# Altium PCB TZ-SB-0001-PCB-[A] (HydroScope Mainboard).PcbDoc (part 1 of 4)
Units mil, origin at the board's own origin, x right, y up, seen from the top; angles counter-clockwise.
Board outline 4500 x 970 mil, 4 copper layers (Top Layer, GND-PWR, GND, Bottom Layer), stack 64.112 mil thick; 165 components, 114 nets, 573 pads, 320 vias.
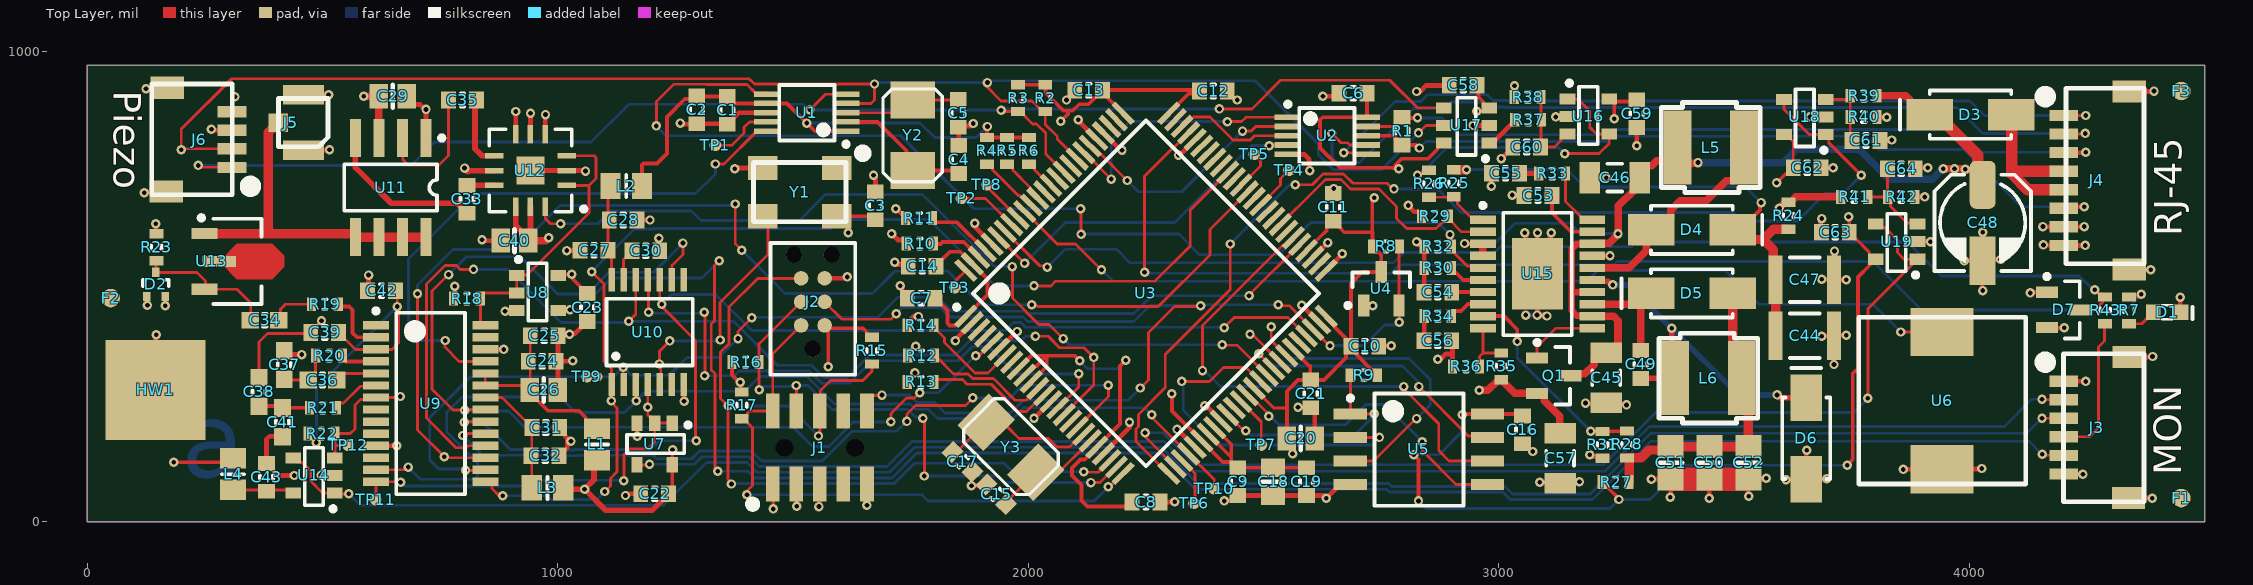
[diagram p0: Top Layer view]
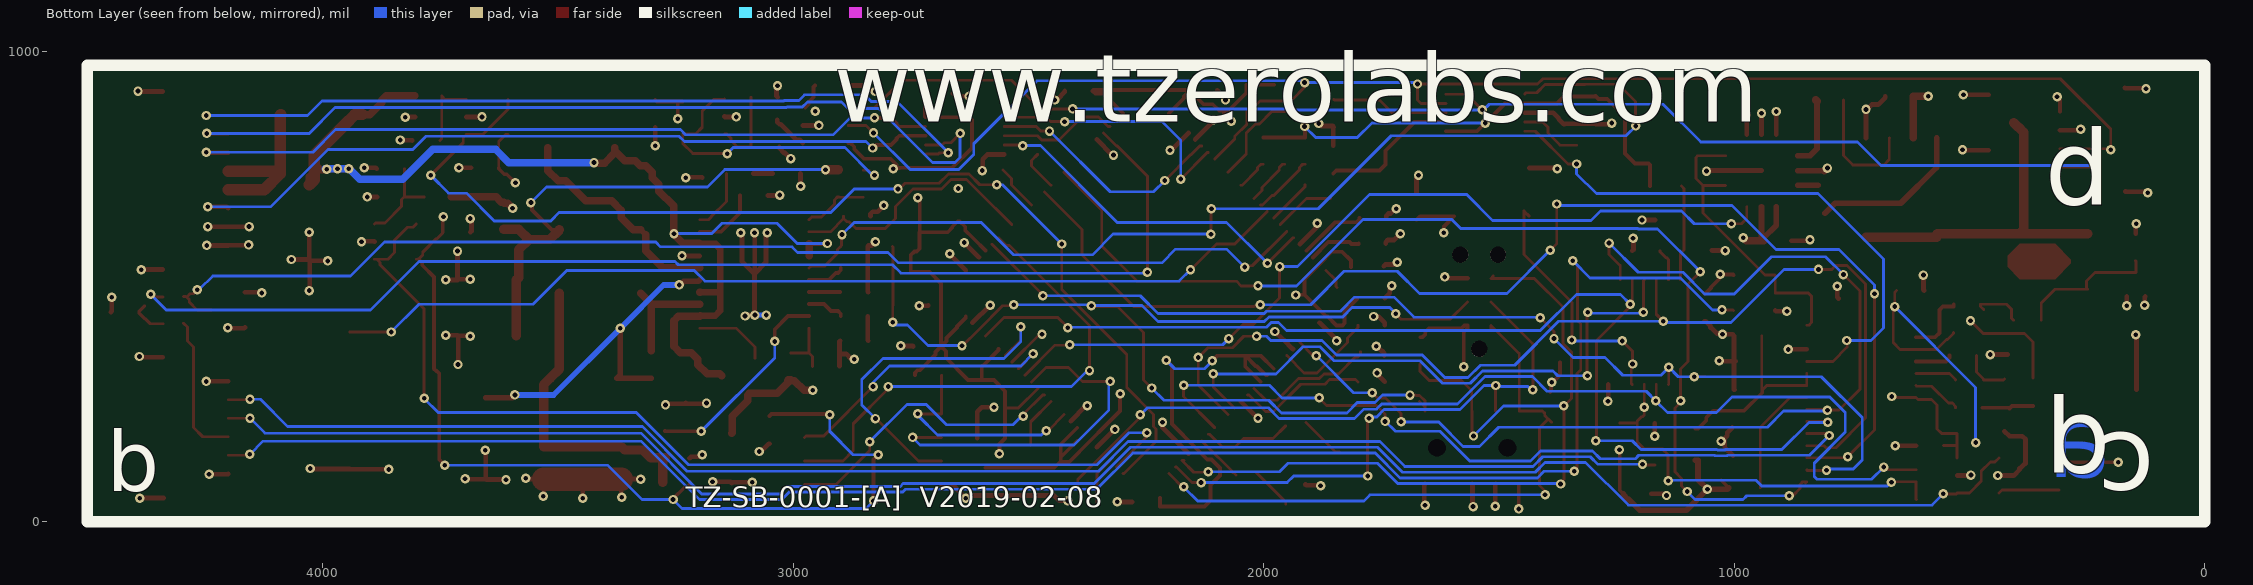
[diagram p1: Bottom Layer view, seen from below]
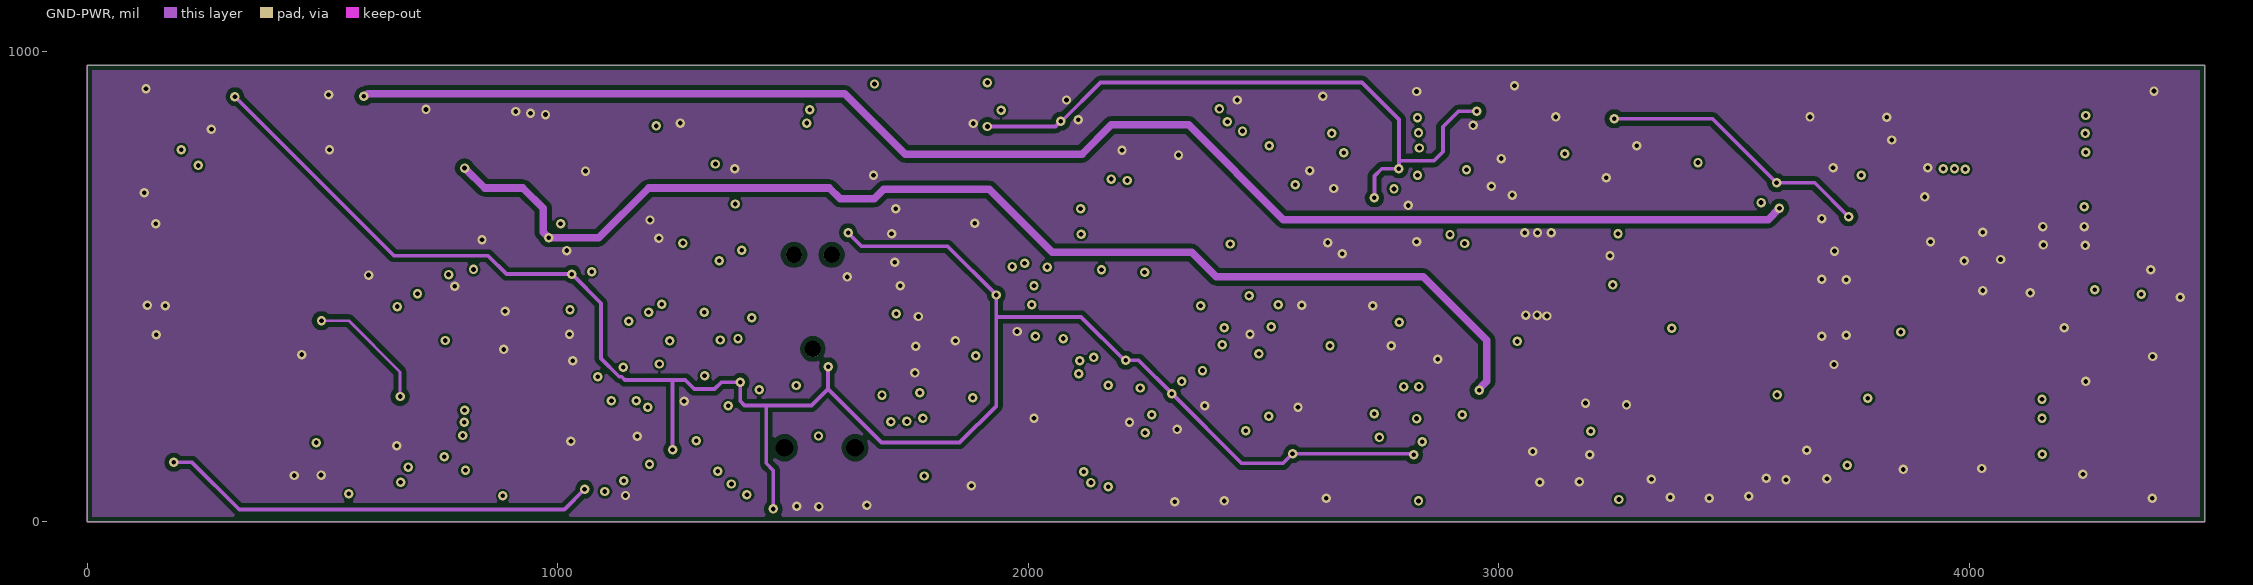
[diagram p2: GND-PWR]
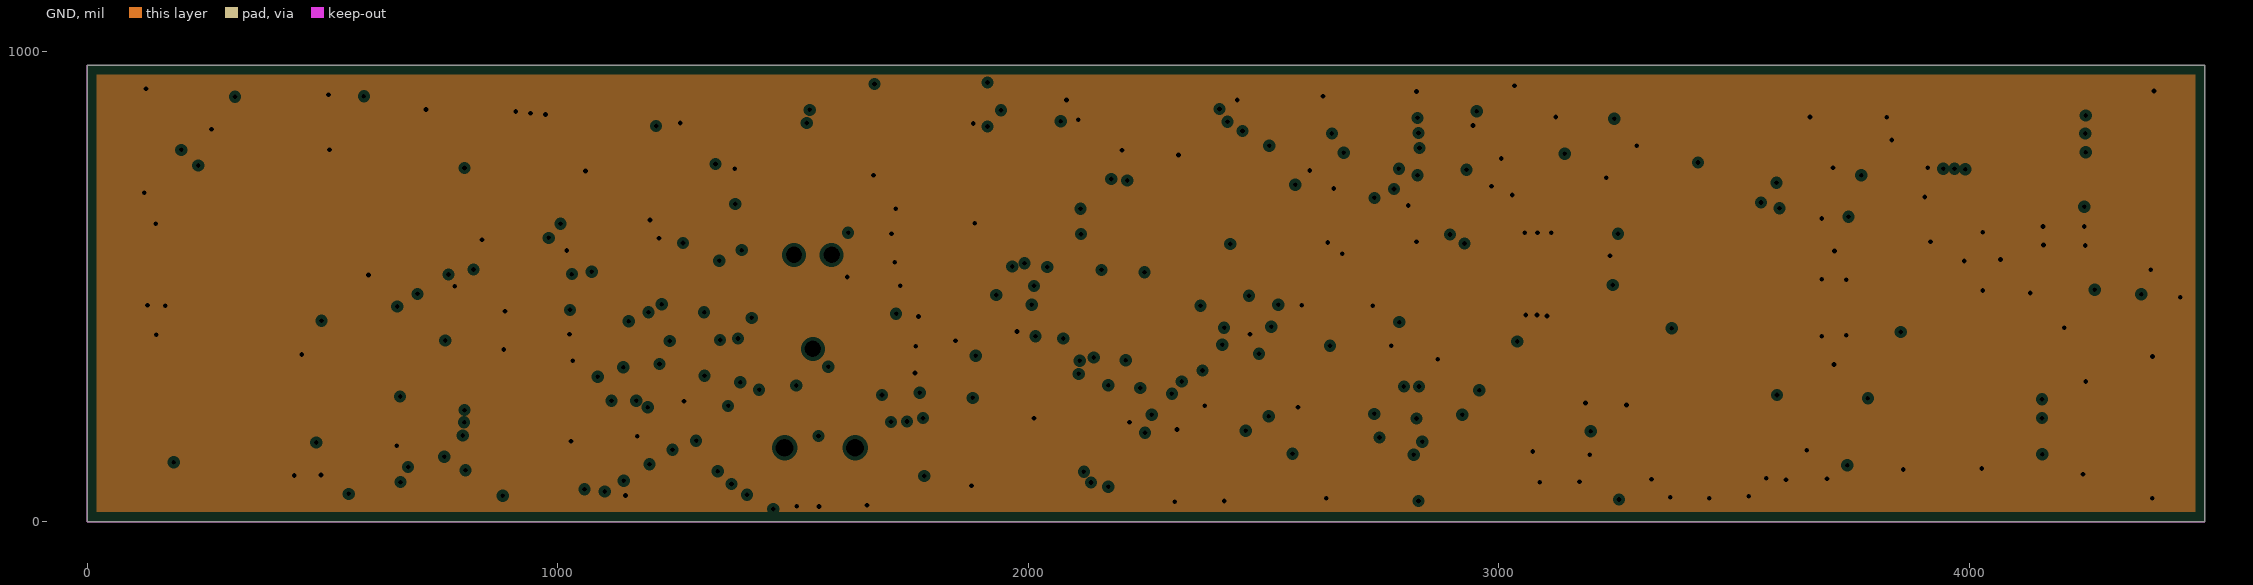
[diagram p3: GND, clearances drawn from the general rule]
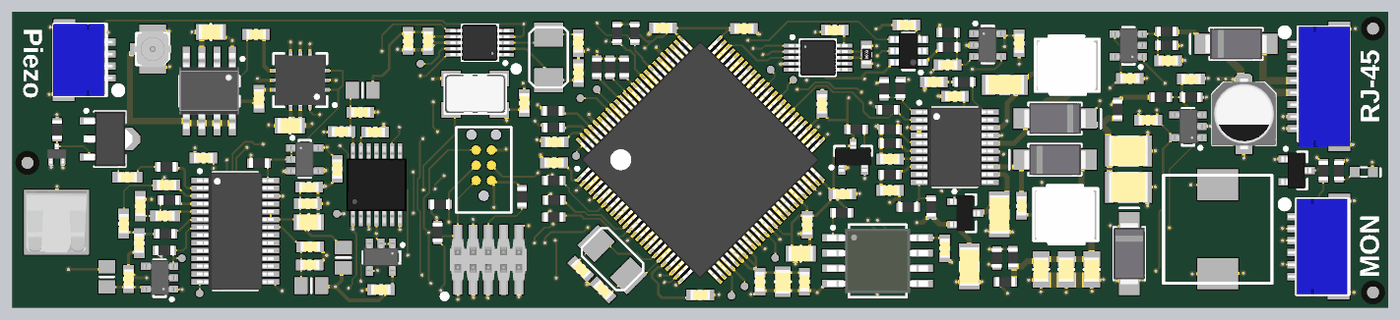
[diagram p6: 3D render of the assembled board from above, using the file's embedded part models]

## Layer stack, top to bottom
Top Solder: solder mask 0.4, Solder Resist, Dk 3.5
Top Layer: signal copper 1.3779
PP1: prepreg 9.8, 2x 2116, Dk 4.2
GND-PWR: signal copper 1.3779
CORE2: core 39, Dk 4.2
GND: plane copper 1.3779, net GND
Dielectric 2: prepreg 9.8, 2x 2116, Dk 4.2
Bottom Layer: signal copper 1.3779
Bottom Solder: solder mask 0.4, Solder Resist, Dk 3.5

## Board outline
0,0 0,970 4500,970 4500,0

## Design rules (kind name [scope] priority, off if disabled: settings)
Clearance Clearance_1 [All] p1: gap=6 ignorepadtopadclearanceinfootprint=FALSE except(10: Arc-Poly Track-Poly SMDPad-Poly THPad-Poly Via-Poly Fill-Poly Poly-Poly)
Clearance [InNet('+HV')] p2: gap=16 ignorepadtopadclearanceinfootprint=FALSE
ComponentClearance ComponentClearance_1 [IsVia vs IsText and OnBottomLayer] p1: gap=0 collisioncheckmode=3 verticalgap=0 showdistances=FALSE
ComponentClearance [All] p2: gap=0 collisioncheckmode=3 verticalgap=0 showdistances=FALSE
PlaneClearance [All] p1: clearance=8
PlaneConnect [All] p1: planeconnectstyle=Direct reliefexpansion=20 reliefentries=4 reliefconductorwidth=10 reliefairgap=10
PolygonConnect [All] p1: connectstyle=Direct reliefconductorwidth=10 reliefentries=4 polygonreliefangle="90 Angle" airgapwidth=10
RoutingVias [All] p1: holewidth=10 width=20 viastyle="Through Hole" minholewidth=10 minwidth=20 maxholewidth=50 maxwidth=75
ShortCircuit ShortCircuit_2 [InNet('+3.3v') vs IsText and OnBottomLayer] p1: allowed=FALSE
ShortCircuit ShortCircuit_1 [InNet('GND') vs IsText and OnBottomLayer] p2: allowed=TRUE
ShortCircuit [All] p3: allowed=FALSE
SilkToSolderMaskClearance SilkscreenOverComponentPads [IsPad] p1: minsilkscreentomaskgap=10 clearancetoexposedcopper=TRUE
SolderMaskExpansion [All] p1: expansion=4 istentingtop=FALSE
SupplyNets "Schematic Supply Nets_10" [InNet('+3.3v+_TDC1000')] p1: voltage=0.000
SupplyNets "Schematic Supply Nets_9" [InNet('+HV')] p2: voltage=0.000
SupplyNets "Schematic Supply Nets_8" [InNet('+MOS_DRV')] p3: voltage=0.000
SupplyNets "Schematic Supply Nets_7" [InNet('+3.3v+_TDC7200')] p4: voltage=0.000
SupplyNets "Schematic Supply Nets_6" [InNet('GND')] p5: voltage=0.000
SupplyNets "Schematic Supply Nets_5" [InNet('+V_ADJ')] p6: voltage=0.000
SupplyNets "Schematic Supply Nets_4" [InNet('DC_DC_VIN')] p7: voltage=0.000
SupplyNets "Schematic Supply Nets_3" [InNet('+VIN')] p8: voltage=0.000
SupplyNets "Schematic Supply Nets_2" [InNet('VCOM')] p9: voltage=0.000
SupplyNets "Schematic Supply Nets_1" [InNet('+HV_PRE')] p10: voltage=0.000
SupplyNets "Schematic Supply Nets" [InNet('+3.3v')] p11: voltage=0.000
Width [All] p1: maxlimit=200 minlimit=6 preferedwidth=6
25 further rules are at their usual default settings.

## Classes and differential pairs
component class "TOP_LEVEL (TZ-SB-0001-[A])": D7 F1 F2 F3 HW1 J3 J4 J5 J6 PCB1 R43

## Components (designator, comment, footprint, x,y, rotation, side; value= is the part's Value field where it differs from the comment)
C1 "0.1µF" C0603_0.90MM_HD 1360,874 r90 top
C2 "0.1µF" C0603_0.90MM_HD 1295,875 r90 top
C3 "0.1µF" C0603_0.90MM_HD 1675,671 r270 top
C4 "18pF" C0603_0.90MM_HD 1852,769.54 r270 top
C5 "18pF" C0603_0.90MM_HD 1851,867.78 r90 top
C6 "0.1µF" C0603_0.90MM_HD 2690,910 r180 top
C7 "0.1µF" C0603_0.90MM_HD 1772,475 r0 top
C8 "0.1µF" C0603_0.90MM_HD 2249.91,41.61 r180 top
C9 "0.1µF" C0603_0.90MM_HD 2445,85 r90 top
C10 "0.1µF" C0603_0.90MM_HD 2715,372.39 r180 top
C11 "0.1µF" C0603_0.90MM_HD 2648,668 r270 top
C12 "0.1µF" C0603_0.90MM_HD 2393,915 r180 top
C13 "0.1µF" C0603_0.90MM_HD 2128,917 r0 top
C14 "0.1µF" C0603_0.90MM_HD 1774.13,542.97 r0 top
C15 "18pF" C0603_0.90MM_HD 1932,58 r315 top
C16 "0.1µF" C0603_0.90MM_HD 3050,195 r90 top
C17 "18pF" C0603_0.90MM_HD 1860,127 r135 top
C18 "10µF" C0805_1.45MM_HD 2520,85 r90 top
C19 "0.1µF" C0603_0.90MM_HD 2591.03,85 r90 top
C20 "10µF" C0805_1.45MM_HD 2579,177 r180 top
C21 "0.1µF" C0603_0.90MM_HD 2600,271.46 r90 top
C22 "0.1µF" C0603_0.90MM_HD 1206,59 r0 top
C23 "0.1µF" C0603_0.90MM_HD 1063,455 r90 top
C24 "10000pF" C0603_0.95MM_HD 967,341 r180 top
C25 "0.1µF" C0603_0.90MM_HD 971,395 r180 top
C26 "10µF" C0805_1.45MM_HD 970,280 r180 top
C27 "0.1µF" C0603_0.90MM_HD 1077,577 r0 top
C28 "1µF" C0603_0.95MM_HD 1139,641 r180 top
C29 "0.47µF" C0805_1.45MM_HD 649.47,904 r180 top
C30 "1µF" C0603_0.95MM_HD 1187,575.48 r0 top
C31 "10000pF" C0603_0.90MM_HD 974.51,200 r180 top
C32 "0.1µF" C0603_0.90MM_HD 973,140 r180 top
C33 "10000pF" C0603_0.95MM_HD 807,685 r270 top
C34 "300pF" C0603_0.90mm_MD 377,428 r0 top
C35 "10000pF" C0603_0.95MM_HD 797.48,896 r180 top
C36 "300pF" C0603_0.90mm_MD 500,301 r180 top
C37 "300pF" C0603_0.90mm_MD 419,333 r270 top
C38 "300pF" C0603_0.90mm_MD 365,275.52 r90 top
C39 "50pF" C0603_0.90MM_HD 504.54,402 r180 top
C40 "0.47µF" C0805_1.45MM_HD 908,597 r0 top
C41 "300pF" C0603_0.90mm_MD 415,211 r270 top
C42 "10000pF" C0603_0.95MM_HD 625.52,491 r0 top
C43 "0.1µF" C0603_0.90MM_HD 381,94 r270 top
C44 "4.7µF" C1210_2.80MM_HD 3650,395 r0 top
C45 "10µF" C1206_1.90MM_HD 3228,306 r90 top
C46 "10µF" C1206_1.90MM_HD 3246,731 r0 top
C47 "4.7µF" C1210_2.80MM_HD 3650,514 r180 top
C48 "33µF" C_ALU_C 4028,635 r270 top
C49 "0.1µF" C0603_0.90MM_HD 3301,334 r90 top
C50 "10µF" C0805_1.45MM_MD 3447,125 r90 top
C51 "10µF" C0805_1.45MM_MD 3365,125 r90 top
C52 "10µF" C0805_1.45MM_MD 3530,125 r90 top
C53 "0.1µF" C0603_0.90MM_HD 3083,693 r0 top
C54 "0.1µF" C0603_0.90MM_HD 2870,487.4 r0 top
C55 "4700pF" C0603_0.95MM_HD 3014,740 r0 top
C56 "4700pF" C0603_0.95MM_HD 2870,384.54 r180 top
C57 "10µF" C1206_1.90MM_HD 3130,135 r90 top
C58 "0.1µF" C0603_0.90MM_HD 2924,927 r0 top
C59 "0.1µF" C0603_0.90MM_HD 3293,867 r90 top
C60 "0.1µF" C0603_0.90MM_HD 3059,796 r0 top
C61 "0.1µF" C0603_0.90MM_HD 3780,810 r180 top
C62 "0.1µF" C0603_0.90MM_HD 3655,752 r180 top
C63 "0.1µF" C0603_0.90MM_HD 3715,615 r0 top
C64 "0.1µF" C0603_0.90MM_HD 3855,750 r180 top
D1 "LED 1.6X0.8MM 570NM GRN CLR SMD" "LED_0603 - GREEN" 4420,445 r0 top
D2 "BAV99T-7-F" D_SOT-523_P 146,504 r90 top
D3 "B160-13-F" D_SMA_P 4002,865 r180 top
D4 "B160-13-F" D_SMA_P 3410,620 r0 top
D5 "B160-13-F" D_SMA_P 3410,485 r180 top
D6 "B160-13-F" D_SMA_P 3653,177 r90 top
D7 "BAV99,215" SOT-23 4200,450 r0 top
F1 "PCB Fiducial" "Fiducial 1mm - 2mm"#1 4441,49.86 r0 top
F2 "PCB Fiducial" "Fiducial 1mm - 2mm"#2 65,578 r0 top
F3 "PCB Fiducial" "Fiducial 1mm - 2mm"#3 4450,913.98 r0 top
HW1 "S8111-46R" S8111-46R 145,280 r0 top
J1 "FTSH-105-01-F-DV" "FTSH-105-04-F-DV - HD" 1557,157 r0 top
J2 "TC2030‐CTL‐NL" "TC2030 NO LATCH" 1542,467 r90 top
J3 "SM6B-SRSS-TB(LF)(SN)" SM06B-SRSS-TB(LF)(SN) 4270,200 r270 top
J4 "SM08B-SRSS-TB(LF)(SN)" SM08B-SRSS-TB(LF)(SN) 4270,725 r270 top
J5 "1909763-1" 1909763-1 433,848 r270 top
J6 "SM04B-SRSS-TB(LF)(SN)" SM04B-SRSS-TB(LF)(SN) 238,812 r90 top
L1 "BKP2125HS600-T" C0805_0.8mm 1083,164 r90 top
L2 "BKP2125HS600-T" C0805_0.8mm 1145.54,713 r0 top
L3 "BKP2125HS600-T" C0805_0.8mm 978,72 r180 top
L4 "BKP2125HS600-T" C0805_0.8mm 310,100.87 r90 top
L5 "22µH 0.9A" L_NRS5020 3450,795 r0 top
L6 "22µH 0.9A" L_NRS5020 3445,305 r0 top
Q1 "FMMT491TA" SOT-23 3116.54,310 r0 top
R1 "100" R0603_HD 2794,830 r90 top
R2 "1k" R0603_0.55MM_HD 2036,900 r90 top
R3 "1k" R0603_0.55MM_HD 1978,900 r90 top
R4 "10k" R0603_0.55MM_HD 1912,788 r270 top
R5 "10k" R0603_0.55MM_HD 1955,788 r270 top
R6 "10k" R0603_0.55MM_HD 2001,788 r270 top
R7 "1k" R0603_0.55MM_HD 4339,449 r90 top
R8 "10k" R0603_0.55MM_HD 2760,585 r180 top
R9 "10k" R0603_0.55MM_HD 2712.6,311.01 r0 top
R10 "10k" R0603_0.55MM_HD 1769.28,591 r0 top
R11 "10k" R0603_0.55MM_HD 1768,645.07 r0 top
R12 "10k" R0603_0.55MM_HD 1772,353 r0 top
R13 "10k" R0603_0.55MM_HD 1771,297 r0 top
R14 "12.4k" R0603_0.55MM_HD 1771,417.31 r0 top
R15 "10k" R0603_0.55MM_HD 1667.46,363.54 r90 top
R16 "10k" R0603_0.55MM_HD 1399,338.85 r180 top
R17 "10k" R0603_0.55MM_HD 1391,247 r90 top
R18 "10k" R0603_0.55MM_HD 807,474 r180 top
R19 "0" R0603_0.55MM_HD 505,462 r0 top
R20 "100" R0603_0.55MM_HD 514,353 r0 top
R21 "100" R0603_0.55MM_HD 501,242 r0 top
R22 "5.1k" R0603_0.55MM_HD 498,187 r0 top
R23 "1k" R0603_0.55MM_HD 147,583 r270 top
R24 "0" R0603_0.55MM_HD 3615,650 r270 top
R25 "560k" R0603_0.55MM_HD 2904,719 r90 top
R26 "10k" R0603_0.55MM_HD 2851,718 r270 top
R27 "0" R0603_0.55MM_HD 3248,84 r0 top
R28 "31.6k" R0603_0.55MM_HD 3272,164 r270 top
R29 "10k" R0603_0.55MM_HD 2864,649 r0 top
R30 "43k" R0603_0.55MM_HD 2870,539.09 r0 top
R31 "10k" R0603_0.55MM_HD 3220,163 r90 top
R32 "10k" R0603_0.55MM_HD 2870,585 r0 top
R33 "43k" R0603_0.55MM_HD 3113,740 r0 top
R34 "43k" R0603_0.55MM_HD 2870,436.73 r0 top
R35 "100k" R0603_0.55MM_HD 3005,330 r270 top
R36 "10k" R0603_0.55MM_HD 2930,330 r0 top
R37 "31.6k" R0603_0.55MM_HD 3062,854 r180 top
R38 "10k" R0603_0.55MM_HD 3061,902 r0 top
R39 "374k" R0603_0.55MM_HD 3775,905 r0 top
R40 "10k" R0603_0.55MM_HD 3775,860 r180 top
R41 "374k" R0603_0.55MM_HD 3755,690 r180 top
R42 "10k" R0603_0.55MM_HD 3855,690 r180 top
R43 "1k" R0603_0.55MM_HD 4288,449 r90 top
TP1 "SMT_TEST" "SMT_TP - 25" 1335,800 r0 top
TP2 "SMT_TEST" "SMT_TP - 25" 1858,687 r0 top
TP3 "SMT_TEST" "SMT_TP - 25" 1844,497.27 r0 top
TP4 "SMT_TEST" "SMT_TP - 25" 2554,747 r90 top
TP5 "SMT_TEST" "SMT_TP - 25" 2480,780.63 r90 top
TP6 "SMT_TEST" "SMT_TP - 25" 2352,39 r0 top
TP7 "SMT_TEST" "SMT_TP - 25" 2495,163 r0 top
TP8 "SMT_TEST" "SMT_TP - 25" 1912,716 r0 top
TP9 "SMT_TEST" "SMT_TP - 25" 1062,308 r0 top
TP10 "SMT_TEST" "SMT_TP - 25" 2395,70 r0 top
TP11 "SMT_TEST" "SMT_TP - 25" 613,47 r0 top
TP12 "SMT_TEST" "SMT_TP - 25" 555,162 r90 top
U1 "SI5351A-B-GTR" "10 MSOP" 1529,869 r180 top
U2 "ISL3176EIUZ-T" "10 MSOP" 2635,820 r0 top
U3 "LPC54606J512BD100E" TSQFP50P1600X1600X160-100N 2250,485 r45 top locked
U4 "MIC803-30D2VM3-TR" SOT-23 2750,495 r90 top
U5 "W25Q64JVSSIQ" SOIC127P830X200-8L 2830,154 r0 top
U6 "PKMCS0909E4000-R1" PKMCS0909E4000-R1 3942,257 r270 top
U7 "SN74AHC1G08DBVR" SOT95P245X145-5L 1206,165 r270 top
U8 "SN74AHC1G08DBVR" SOT95P245X145-5L 957,486 r0 top
U9 "TDC1000PW" TSOP65P640X120-28N 729.86,250.98 r0 top
U10 "TDC7200PWR" TSSOP14 1204,402.78 r90 top
U11 "TC6320TG-G" "SOIC 8" 645,710 r180 top
U12 "MD1213K6-G" QFN80P400X400X100_HS-13N 942,746 r180 top
U13 "MD0100N8-G" SOT89-150P410X160-3N 320,553 r0 top
U14 "OPA353NA/250" SOT23-5 482,98.11 r180 top
U15 "LT3570EFE#PBF" TSOP65P640X120_HS-21N 3082.11,526.3 r0 top
U16 "OPA348AIDBVR" SOT23-5 3190,861 r0 top
U17 "MCP4725A0T-E/CH" SOT95P245X145-6L 2931,842 r180 top
U18 "OPA348AIDBVR" SOT23-5 3650,860 r180 top
U19 "OPA348AIDBVR" SOT23-5 3845,595 r180 top
Y1 "FOX924B-16.000" FOX924 1514.26,700.18 r180 top
Y2 "ABM3-25.000MHZ-B4Y-T" ABM3 1754,821 r270 top
Y3 "12MHz" ABM3 1963,157.89 r315 top

## Footprints (in the part's own frame and the unit in brackets; to place one, negate y for a bottom-side part, rotate by r counter-clockwise, add the part's x,y. Pads: shape width x height; smd on the part's side, far side on the other; paste and mask are expansions set on the pad)
"10 MSOP" [mm] "(Reference LTC DWG # 05-08-1661 Rev E)"
  rect 1.45x0.3 smd: 1(-2.125,1) 2(-2.125,0.5) 3(-2.125,0) 4(-2.125,-0.5) 5(-2.125,-1) 6(2.125,-1) 7(2.125,-0.5) 8(2.125,0) 9(2.125,0.5) 10(2.125,1)
  silkscreen extent -2.25,-1.5 1.48,1.82, body extent -2.45,-1.5 2.45,1.5, height 1.15
1909763-1 [mm] "CONN UMCC JACK STR 50OHM SMD"
  rect 1.05x2.2 smd: 1(-1.5,0.675) 2(1.5,0.675)
  rect 1x1.05 smd: 3(0,-0.675)
  silkscreen extent -1.3,-0.67 1.3,2, body extent -1.5,-0.87 1.5,2.23, height 1.24
ABM3 [mm] "Abracon Crystal 5x3.2mm"
  rect 2x2.4 smd: 1(-1.9,0) 2(1.9,0)
  silkscreen extent -2.5,-1.6 2.5,1.6, body extent -2.5,-1.6 2.5,1.6, height 1.3
C0603_0.90MM_HD [mm] "Capacitor 0603 - High Density"
  rect 0.8x0.9 smd: 1(-0.75,0) 2(0.75,0)
  silkscreen extent -0.1,-0.35 0.1,0.35, body extent -0.8,-0.4 0.8,0.4, height 0.9
C0603_0.90mm_MD [mm] "Capacitor 0603 - Medium Density"
  rect 0.95x0.9 smd: 1(-0.775,0) 2(0.775,0)
  silkscreen extent -0.1,-0.35 0.1,0.35, body extent -0.8,-0.4 0.8,0.4, height 0.9
C0603_0.95MM_HD [mm] "Capacitor 0603 - High Density"
  rect 0.8x0.9 smd: 1(-0.75,0) 2(0.75,0)
  silkscreen extent -0.1,-0.35 0.1,0.35, body extent -0.8,-0.4 0.8,0.4, height 0.9
C0805_0.8mm [mm] "Chip Capacitor, Body 2.0x0.8mm, IPC High Density"
  rect 1.1x1.4 smd: 1(-0.85,0) 2(0.85,0)
  silkscreen extent 0,-0.6 0,0.6, body extent -1,-0.6 1,0.6, height 0.8
C0805_1.45MM_HD [mm] "Capacitor - 0805 - High Density"
  rect 1x1.3 smd: 1(-0.75,0) 2(0.75,0)
  silkscreen extent 0,-0.62 0,0.63, body extent -1,-0.64 1,0.61, height 1.45
C0805_1.45MM_MD [mm] "Capacitor - 0805 - Medium Density"
  rect 1.25x1.4 smd: 1(-0.875,0) 2(0.875,0)
  silkscreen extent 0,-0.62 0,0.63, body extent -1,-0.62 1,0.63, height 1.45
C1206_1.90MM_HD [mm] "Capacitor - 1206 - High Density"
  rect 1.1x1.7 smd: 1(-1.35,0) 2(1.35,0)
  silkscreen extent -0.4,-0.75 0.4,0.75, body extent -1.6,-0.8 1.6,0.8, height 1.9
C1210_2.80MM_HD [mm] "Capacitor - 1210 - High Density"
  rect 0.75x2.6 smd: 1(-1.575,0) 2(1.575,0)
  silkscreen extent -0.8,-1.2 0.8,1.2, body extent -1.6,-1.25 1.6,1.25, height 2.8
C_ALU_C [mm] "5.0mm x 5.8mm"
  rrect50% 2.6x1.4 smd: 1(-2.05,0)
  rect 2.6x1.4 smd: 2(2.05,0)
  silkscreen extent -2.6,-2.6 2.6,2.6, body extent -2.98,-2.65 2.92,2.65, height 5.42
D_SMA_P [mm] "SMA Diode - Polarized"
  rect 2.5x1.7 smd: 1(-2.2,0) 2(2.2,0)
  silkscreen extent -2.2,-1.3 3.8,1.3, body extent -2.6,-1.3 2.6,1.3, height 2.35
D_SOT-523_P [mm] "SOT-523 Diode - Polarized"
  rect 0.51x0.4 smd: 1(-0.65,0.5) 2(-0.65,-0.5) 3(0.65,0)
  silkscreen extent -0.1,-0.7 0.25,0.7, body extent -0.8,-0.8 0.8,0.8, height 0.8
"Fiducial 1mm - 2mm"#1 [mm] "1mm Pad 2mm Opening"
  round 1 smd mask+0.5: 1(0.229,0.004)
"Fiducial 1mm - 2mm"#2 [mm] "1mm Pad 2mm Opening"
  round 1 smd mask+0.5: 1(-0.381,-2.616)
"Fiducial 1mm - 2mm"#3 [mm] "1mm Pad 2mm Opening"
  round 1 smd mask+0.5: 1(0,0.026)
FOX924 [mm] "3.3V Ultra Miniature SMD HCMOS TCXO/VCTCXO"
  rect 1.6x1.3 smd: 1(-2,-1.3) 2(2,-1.3) 3(2,1.3) 4(-2,1.3)
  silkscreen extent -3.62,-2.32 2.5,1.6, body extent -2.5,-1.62 2.5,1.58, height 1.6
"FTSH-105-04-F-DV - HD" [mil] "Connector for Cortex Serial Wire Debug"
  rect 29x75 smd: 1(-100,-77) 2(-100,78) 3(-50,-77) 4(-50,78) 5(0,-77) 6(0,78) 7(50,-77) 8(50,78) 9(100,-77) 10(100,78)
  rect 0x0 hole 38 unplated: M(-75,0) M(75,0)
  body extent -125,-115 125,115, height 264
L_NRS5020 [mm] "Inductor"
  rect 1.5x4 smd: 1(-1.8,0) 2(1.8,0)
  silkscreen extent -2.67,-2.43 2.67,2.43, body extent -2.5,-2.47 2.4,2.43, height 2
"LED_0603 - GREEN" [mm] "LED_0603 - GREEN"
  rect 0.8x0.85 smd: A(-0.75,0) C(0.75,0)
  silkscreen extent -0.25,-0.38 1.37,0.38, body extent -0.8,-0.4 0.8,0.4, height 0.75
PKMCS0909E4000-R1 [mm]
  rect 2.6x3.4 smd: 1(-3.7,0) 2(3.7,0)
  silkscreen extent -4.5,-4.5 4.5,4.5, body extent -4.5,-4.5 4.5,4.5, height 1.9
QFN80P400X400X100_HS-13N [mm] "QFN, 12-Leads, Body 4.00x4.00mm, Pitch 0.80mm, Thermal Pad 1.50x1.50mm, IPC Medium Density"
  rect 1x0.3 smd: 1(-1.95,0.8) 2(-1.95,0) 3(-1.95,-0.8) 7(1.95,-0.8) 8(1.95,0) 9(1.95,0.8)
  rect 0.3x1 smd: 4(-0.8,-1.95) 5(0,-1.95) 6(0.8,-1.95) 10(0.8,1.95) 11(0,1.95) 12(-0.8,1.95)
  rect 1.5x1.5 smd: 13(0,0)
  silkscreen extent -3,-2.23 2.23,2.22, body extent -2.12,-2.12 2.12,2.12, height 1
R0603_0.55MM_HD [mm] "Resistor 0603 High Density"
  rect 0.5x0.75 smd: 1(-0.725,0) 2(0.725,0)
  silkscreen extent -0.1,-0.28 0.1,0.28, body extent -0.8,-0.4 0.8,0.4, height 0.55
R0603_HD [mm] "0603 Resistor - High Density"
  rect 0.8x0.9 smd: 1(-0.75,0) 2(0.75,0)
  silkscreen extent -0.15,-0.35 0.15,0.35, body extent -0.8,-0.4 0.8,0.4, height 0.46
S8111-46R [mm]
  rect 5.4x5.4 smd: 1(0,0)
  body extent -2.51,-2.55 2.49,2.55, height 1.85
SM04B-SRSS-TB(LF)(SN) [mm] "CONN HEADR SH 4POS SIDE 1MM TIN"
  rect 0.6x1.55 smd: 1(-1.5,-1.769) 2(-0.5,-1.769) 3(0.5,-1.769) 4(1.5,-1.769)
  rect 1.2x1.8 smd: M1(-2.8,1.769) M2(2.8,1.719)
  silkscreen extent -2.97,-3.05 3,2.56, body extent -3,-2.31 3,2.64, height 2.91
SM06B-SRSS-TB(LF)(SN) [mm] "CONN HEADR SH 6POS SIDE 1MM TIN"
  rect 0.6x1.55 smd: 1(-2.5,-1.769) 2(-1.5,-1.769) 3(-0.5,-1.769) 4(0.5,-1.769) 5(1.5,-1.769) 6(2.5,-1.769)
  rect 1.2x1.8 smd: M1(-3.8,1.769) M2(3.8,1.719)
  silkscreen extent -3.97,-3.05 4,2.56, body extent -4,-2.51 4,2.44, height 2.97
SM08B-SRSS-TB(LF)(SN) [mm] "CONN HEADR SH 8POS SIDE 1MM TIN"
  rect 0.6x1.55 smd: 1(-3.5,-1.769) 2(-2.5,-1.769) 3(-1.5,-1.769) 4(-0.5,-1.769) 5(0.5,-1.769) 6(1.5,-1.769) 7(2.5,-1.769) 8(3.5,-1.769)
  rect 1.2x1.8 smd: M1(-4.8,1.769) M2(4.8,1.769)
  silkscreen extent -4.97,-3.05 4.5,2.56, body extent -5,-2.3 5,2.65, height 2.91
"SMT_TP - 25" [mil] ".025\" SMT Test pad"
  round 25 smd: 1(0,0)
SOIC127P830X200-8L [mm] "SOIC, 8-Leads, Body 6.1x6.2mm (max), Pitch 1.27mm, IPC High Density"
  rect 1.8x0.6 smd: 1(-3.7,1.905) 2(-3.7,0.635) 3(-3.7,-0.635) 4(-3.7,-1.905) 5(3.7,-1.905) 6(3.7,-0.635) 7(3.7,0.635) 8(3.7,1.905)
  silkscreen extent -3.82,-3.05 2.4,3, body extent -4.2,-2.7 4.2,2.68, height 2.3
"SOIC 8" [mm]
  rect 0.6x2.05 smd: 1(-1.905,-2.675) 2(-0.635,-2.675) 3(0.635,-2.675) 4(1.905,-2.675) 5(1.905,2.675) 6(0.635,2.675) 7(-0.635,2.675) 8(-1.905,2.675)
  silkscreen extent -2.88,-2.8 2.5,1.25, body extent -2.49,-3.19 2.51,3.14, height 1.88
SOT23-5 [mm] "SOT23, 5-Leads, Body 3.1x2.6mm (max), Pitch 0.95mm, IPC High Density"
  rect 0.85x0.6 smd: 1(-1.125,0.95) 2(-1.125,0) 3(-1.125,-0.95) 4(1.125,-0.95) 5(1.125,0.95)
  silkscreen extent -1.15,-1.5 0.5,1.92, body extent -1.38,-1.45 1.32,1.45, height 1.15
SOT89-150P410X160-3N [mm] "SOT89, 3-Leads, Body 4.50x2.45mm, Pitch 1.50mm, Lead Span 4.1mm, IPC Medium Density"
  rect 1.4x0.6 smd: 1(-1.8,1.5) 3(-1.8,-1.5)
  rect 1.8x0.6 smd: 2(-1,0)
  Top Layer region: -0.9,0.1 -0.05,0.95 1.85,0.95 2.5,0.3 2.5,-0.3 1.85,-0.95 -0.05,-0.95 -0.9,-0.1
  silkscreen extent -2.09,-2.3 1.28,2.47, body extent -2.2,-2.3 1.85,2.3, height 1.6
SOT95P245X145-5L [mm] "SOT23, 5-Leads, Body 3.1x2.6mm (max), Pitch 0.95mm, IPC High Density"
  rect 0.85x0.6 smd: 1(-1.125,0.95) 2(-1.125,0) 3(-1.125,-0.95) 4(1.125,-0.95) 5(1.125,0.95)
  silkscreen extent -1.15,-1.5 0.5,1.93, body extent -1.38,-1.45 1.32,1.45, height 1.15
SOT95P245X145-6L [mm] "SOT23, 6-Leads, Body 3.1x2.6mm (max), Pitch 0.95mm, IPC High Density"
  rect 0.85x0.6 smd: 1(-1.225,0.95) 2(-1.225,0) 3(-1.225,-0.95) 4(1.225,-0.95) 5(1.225,0) 6(1.225,0.95)
  silkscreen extent -1.15,-1.5 0.5,1.92, body extent -1.5,-1.5 1.5,1.5, height 1.3
SOT-23 [mm] "SOT-23"
  rect 1.2x0.6 smd: 1(-0.9,0.95) 2(-0.9,-0.95) 3(0.9,0)
  silkscreen extent -1.02,-1.55 0.87,1.92, body extent -1.27,-1.5 1.23,1.5, height 1.07
"TC2030 NO LATCH" [mil] "TC2030  NO LATCH"
  round 31 smd paste-40: 1(-50,-25) 2(-50,25) 3(0,-25) 4(0,25) 5(50,-25) 6(50,25)
  round 34 hole 35 unplated: A(-100,0) B(100,40) C(100,-40)
  silkscreen extent -155,-90 125,90
TSOP65P640X120-28N [mm] "TSOP, 28-Leads, Body 9.70x4.40mm, Pitch 0.65mm, IPC Medium Density"
  rect 1.4x0.45 smd: 1(-2.95,4.225) 2(-2.95,3.575) 3(-2.95,2.925) 4(-2.95,2.275) 5(-2.95,1.625) 6(-2.95,0.975) 7(-2.95,0.325) 8(-2.95,-0.325) 9(-2.95,-0.975) 10(-2.95,-1.625) 11(-2.95,-2.275) 12(-2.95,-2.925) 13(-2.95,-3.575) 14(-2.95,-4.225) 15(2.95,-4.225) 16(2.95,-3.575) 17(2.95,-2.925) 18(2.95,-2.275) 19(2.95,-1.625) 20(2.95,-0.975) 21(2.95,-0.325) 22(2.95,0.325) 23(2.95,0.975) 24(2.95,1.625) 25(2.95,2.275) 26(2.95,2.925) 27(2.95,3.575) 28(2.95,4.225)
  silkscreen extent -3.07,-4.9 1.85,5.12, body extent -3.2,-4.9 3.2,4.9, height 1.2
TSOP65P640X120_HS-21N [mm] "TSOP, 20-Leads, Body 6.50x4.40mm, Pitch 0.65mm, Thermal Pad 3.86x2.74mm, IPC Medium Density"
  rect 1.4x0.45 smd: 1(-2.95,2.925) 2(-2.95,2.275) 3(-2.95,1.625) 4(-2.95,0.975) 5(-2.95,0.325) 6(-2.95,-0.325) 7(-2.95,-0.975) 8(-2.95,-1.625) 9(-2.95,-2.275) 10(-2.95,-2.925) 11(2.95,-2.925) 12(2.95,-2.275) 13(2.95,-1.625) 14(2.95,-0.975) 15(2.95,-0.325) 16(2.95,0.325) 17(2.95,0.975) 18(2.95,1.625) 19(2.95,2.275) 20(2.95,2.925)
  rect 2.74x3.86 smd: 21(0,0)
  silkscreen extent -3.07,-3.3 1.85,3.82, body extent -3.2,-3.3 3.2,3.3, height 1.2
TSQFP50P1600X1600X160-100N [mm] "TSQFP, 100-Leads, Body 14.00x14.00mm, Pitch 0.50mm, IPC Medium Density"
  rect 1.5x0.3 smd paste-0.076: 1(-7.75,6) 2(-7.75,5.5) 3(-7.75,5) 4(-7.75,4.5) 5(-7.75,4) 6(-7.75,3.5) 7(-7.75,3) 8(-7.75,2.5) 9(-7.75,2) 10(-7.75,1.5) 11(-7.75,1) 12(-7.75,0.5) 13(-7.75,0) 14(-7.75,-0.5) 15(-7.75,-1) 16(-7.75,-1.5) 17(-7.75,-2) 18(-7.75,-2.5) 19(-7.75,-3) 20(-7.75,-3.5) 21(-7.75,-4) 22(-7.75,-4.5) 23(-7.75,-5) 24(-7.75,-5.5) 25(-7.75,-6) 51(7.75,-6) 52(7.75,-5.5) 53(7.75,-5) 54(7.75,-4.5) 55(7.75,-4) 56(7.75,-3.5) 57(7.75,-3) 58(7.75,-2.5) 59(7.75,-2) 60(7.75,-1.5) 61(7.75,-1) 62(7.75,-0.5) 63(7.75,0) 64(7.75,0.5) 65(7.75,1) 66(7.75,1.5) 67(7.75,2) 68(7.75,2.5) 69(7.75,3) 70(7.75,3.5) 71(7.75,4) 72(7.75,4.5) 73(7.75,5) 74(7.75,5.5) 75(7.75,6)
  rect 0.3x1.5 smd paste-0.076: 26(-6,-7.75) 27(-5.5,-7.75) 28(-5,-7.75) 29(-4.5,-7.75) 30(-4,-7.75) 31(-3.5,-7.75) 32(-3,-7.75) 33(-2.5,-7.75) 34(-2,-7.75) 35(-1.5,-7.75) 36(-1,-7.75) 37(-0.5,-7.75) 38(0,-7.75) 39(0.5,-7.75) 40(1,-7.75) 41(1.5,-7.75) 42(2,-7.75) 43(2.5,-7.75) 44(3,-7.75) 45(3.5,-7.75) 46(4,-7.75) 47(4.5,-7.75) 48(5,-7.75) 49(5.5,-7.75) 50(6,-7.75) 76(6,7.75) 77(5.5,7.75) 78(5,7.75) 79(4.5,7.75) 80(4,7.75) 81(3.5,7.75) 82(3,7.75) 83(2.5,7.75) 84(2,7.75) 85(1.5,7.75) 86(1,7.75) 87(0.5,7.75) 88(0,7.75) 89(-0.5,7.75) 90(-1,7.75) 91(-1.5,7.75) 92(-2,7.75) 93(-2.5,7.75) 94(-3,7.75) 95(-3.5,7.75) 96(-4,7.75) 97(-4.5,7.75) 98(-5,7.75) 99(-5.5,7.75) 100(-6,7.75)
  silkscreen extent -7.87,-6.6 6.6,6.82, body extent -8,-8 8,8, height 1.6
TSSOP14 [mm] "TSSOP14"
  rect 1.25x0.35 smd: 1(-2.825,2.275) 2(-2.825,1.625) 3(-2.825,0.975) 4(-2.825,0.325) 5(-2.825,-0.325) 6(-2.825,-0.975) 7(-2.825,-1.625) 8(2.825,-1.625) 9(2.825,-0.975) 10(2.825,-0.325) 11(2.825,0.325) 12(2.825,0.975) 13(2.825,1.625) 14(2.825,2.275)
  silkscreen extent -1.8,-2.1 1.8,2.55, body extent -3.2,-2.17 3.2,2.83, height 1.1

## Part data
C1 C2 C3 C6 C7 C8 C9 C10 C11 C12 C13 C14 C16 C19 C21 C22 C23 C25 C27 C32 C43 C49 C53 C54 C58 C59 C60 C61 C62 C63 C64: library part CGA3E2X7R1H104K080AE, "CAP CER 0.1UF 50V X7R 0603", Manufacturer="TDK Corporation", Operating Temperature="-55°C ~ 125°C", Package=0603, Ratings=AEC-Q200, Supplier Part Number 1=445-15957-1-ND, Temperature Coefficient=X7R, Tolerance=±10%, Voltage - Rated=50V, Category=Capacitors, ComponentLink1Description="Datasheet (Internal)", ComponentLink1URL=datasheets\TDK\mlcc_automotive_general_en.pdf, ComponentLink2Description="Datasheet (External)", ComponentLink2URL=https://product.tdk.com/info/en/catalog/datasheets/mlcc_automotive_general_en.pdf, Features="Soft Termination", Manufacturer Part Number=CGA3E2X7R1H104K080AE, Substitution Notes="0.1µF , 50V , ±10% , X7R , -55°C ~ 125°C , AEC-Q200 , 0603", Supplier 1=Digikey, Thickness (Max)=0.90MM
C4 C5 C15 C17: library part CGA3E2C0G1H180J080AA, "CAP CER 18PF 50V C0G 0603", Manufacturer="TDK Corporation", Operating Temperature="-55°C ~ 125°C", Package=0603, Ratings=AEC-Q200, Supplier Part Number 1=445-5631-1-ND, Temperature Coefficient="C0G, NP0", Tolerance=±5%, Voltage - Rated=50V, Category=Capacitors, ComponentLink1Description="Datasheet (Internal)", ComponentLink1URL=datasheets\TDK\mlcc_automotive_general_en.pdf, ComponentLink2Description="Datasheet (External)", ComponentLink2URL=https://product.tdk.com/info/en/catalog/datasheets/mlcc_automotive_general_en.pdf, Features=-, Manufacturer Part Number=CGA3E2C0G1H180J080AA, Substitution Notes="18pF , 50V , ±5% , C0G, NP0 , -55°C ~ 125°C , AEC-Q200 , 0603", Supplier 1=Digikey, Thickness (Max)=0.90MM
C18 C20 C26 C50 C51 C52: library part CGA4J1X7R0J106K125AC, "CAP CER 10UF 6.3V X7R 0805", Manufacturer="TDK Corporation", Operating Temperature="-55°C ~ 125°C", Package=0805, Ratings=AEC-Q200, Supplier Part Number 1=445-6971-1-ND, Temperature Coefficient=X7R, Tolerance=±10%, Voltage - Rated=6.3V, Category=Capacitors, ComponentLink1Description="Datasheet (Internal)", ComponentLink1URL=datasheets\TDK\mlcc_automotive_general_en.pdf, ComponentLink2Description="Datasheet (External)", ComponentLink2URL=https://product.tdk.com/info/en/catalog/datasheets/mlcc_automotive_general_en.pdf, Features=-, Manufacturer Part Number=CGA4J1X7R0J106K125AC, Substitution Notes="10µF , 6.3V , ±10% , X7R , -55°C ~ 125°C , AEC-Q200 , 0805", Supplier 1=Digikey, Thickness (Max)=1.45MM
C24 C33 C35 C42: library part CGA3E1C0G2A103J080AE, "CAP CER 10000PF 100V C0GNP0 0603", Manufacturer="TDK Corporation", Operating Temperature="-55°C ~ 125°C", Package=0603, Ratings=AEC-Q200, Supplier Part Number 1=445-175658-1-ND, Temperature Coefficient="C0G, NP0", Tolerance=±5%, Voltage - Rated=100V, Category=Capacitors, ComponentLink1Description="Datasheet (Internal)", ComponentLink1URL=datasheets\TDK\mlcc_automotive_general_en.pdf, ComponentLink2Description="Datasheet (External)", ComponentLink2URL=https://product.tdk.com/info/en/catalog/datasheets/mlcc_automotive_general_en.pdf, Features="Soft Termination", Manufacturer Part Number=CGA3E1C0G2A103J080AE, Substitution Notes="10000pF , 100V , ±5% , C0G, NP0 , -55°C ~ 125°C , AEC-Q200 , 0603", Supplier 1=Digikey, Thickness (Max)=0.95MM
C28 C30: library part CGA3E1X7R1E105K080AE, "CAP CER 1UF 25V X7R 0603", Manufacturer="TDK Corporation", Operating Temperature="-55°C ~ 125°C", Package=0603, Ratings=AEC-Q200, Supplier Part Number 1=445-173628-1-ND, Temperature Coefficient=X7R, Tolerance=±10%, Voltage - Rated=25V, Category=Capacitors, ComponentLink1Description="Datasheet (Internal)", ComponentLink1URL=datasheets\TDK\mlcc_automotive_general_en.pdf, ComponentLink2Description="Datasheet (External)", ComponentLink2URL=https://product.tdk.com/info/en/catalog/datasheets/mlcc_automotive_general_en.pdf, Features="Soft Termination", Manufacturer Part Number=CGA3E1X7R1E105K080AE, Substitution Notes="1µF , 25V , ±10% , X7R , -55°C ~ 125°C , AEC-Q200 , 0603", Supplier 1=Digikey, Thickness (Max)=0.95MM
C29 C40: library part CGA4J3X7R1H474K125AE, "CAP CER 0.47UF 50V X7R 0805", Manufacturer="TDK Corporation", Operating Temperature="-55°C ~ 125°C", Package=0805, Ratings=AEC-Q200, Supplier Part Number 1=445-8786-1-ND, Temperature Coefficient=X7R, Tolerance=±10%, Voltage - Rated=50V, Category=Capacitors, ComponentLink1Description="Datasheet (Internal)", ComponentLink1URL=datasheets\TDK\mlcc_automotive_general_en.pdf, ComponentLink2Description="Datasheet (External)", ComponentLink2URL=https://product.tdk.com/info/en/catalog/datasheets/mlcc_automotive_general_en.pdf, Features="Soft Termination", Manufacturer Part Number=CGA4J3X7R1H474K125AE, Substitution Notes="0.47µF , 50V , ±10% , X7R , -55°C ~ 125°C , AEC-Q200 , 0805", Supplier 1=Digikey, Thickness (Max)=1.45MM
C31: library part CGA3E2X7R1H103M080AE, "CAP CER 10000PF 50V X7R 0603", Manufacturer="TDK Corporation", Operating Temperature="-55°C ~ 125°C", Package=0603, Ratings=AEC-Q200, Supplier Part Number 1=445-15956-1-ND, Temperature Coefficient=X7R, Tolerance=±20%, Voltage - Rated=50V, Category=Capacitors, ComponentLink1Description="Datasheet (Internal)", ComponentLink1URL=datasheets\TDK\mlcc_automotive_general_en.pdf, ComponentLink2Description="Datasheet (External)", ComponentLink2URL=https://product.tdk.com/info/en/catalog/datasheets/mlcc_automotive_general_en.pdf, Features="Soft Termination", Manufacturer Part Number=CGA3E2X7R1H103M080AE, Substitution Notes="10000pF , 50V , ±20% , X7R , -55°C ~ 125°C , AEC-Q200 , 0603", Supplier 1=Digikey, Thickness (Max)=0.90MM
C34 C36 C37 C38 C41: library part CL10C301JB8NNNC, "Cap Ceramic 300pF 50V C0G 5% SMD 0603 125C Paper T/R", Case/Package=0603, Case Code (Metric)=1608, Dielectric=C0G, Manufacturer=Samsung, Max Operating Temperature=125°C, Min Operating Temperature=-55°C, Package Quantity=1, Supplier Part Number 1=1276-2261-1-ND, Tolerance=5%, Voltage Rating=50V, Capacitance=300pF, Case Code (Imperial)=0603, ComponentLink1Description=https://datasheet.ciiva.com/25733/cl10c301jb8nnnc-25733017.pdf?src-supplier=Digi-Key, ComponentLink1URL=https://datasheet.ciiva.com/25733/cl10c301jb8nnnc-25733017.pdf?src-supplier=Digi-Key, Depth=0.8mm, Height=0.8mm, Lead Free="Lead Free", Length=1.6mm, Manufacturer Part Number=CL10C301JB8NNNC, Mount="Surface Mount", Packaging="Tape and Reel", Pricing 1="1 = 0.10000, 10 = 0.06500, 100 = 0.02910, 500 = 0.02080, 1000 = 0.01634 (USD)", Radiation Hardening=No, RoHS=Yes, Stock 1=199782, Supplier 1=Digi-Key, Thickness=0.035inch, Voltage Rating (DC)=50V, Width=0.031inch
C39: library part CL10C500JC81PNC, "CAP CER 50PF 100V C0G/NP0 0603", Manufacturer="Samsung Electro-Mechanics", Operating Temperature="-55°C ~ 125°C", Package=0603, Ratings=AEC-Q200, Supplier Part Number 1=1276-6589-1-ND, Temperature Coefficient="C0G, NP0", Tolerance=±5%, Voltage - Rated=100V, Category=Capacitors, ComponentLink1Description="Datasheet (Internal)", ComponentLink1URL=datasheets\Samsung\CL05B153KB5VPNC.pdf.pdf, ComponentLink2Description="Datasheet (External)", ComponentLink2URL=http://www.samsungsem.com/kr/support/product-search/mlcc/__icsFiles/afieldfile/2017/05/25/CL05B153KB5VPNC.pdf, Features=-, Manufacturer Part Number=CL10C500JC81PNC, Substitution Notes="50pF , 100V , -55°C ~ 125°C , C0G, NP0  , AEC-Q200 , 0603", Supplier 1=Digikey, Thickness (Max)=0.90MM
C44 C47: library part CGA6P3X7R1H475M250AB, "CAP CER 4.7UF 50V X7R 1210", Manufacturer="TDK Corporation", Operating Temperature="-55°C ~ 125°C", Package=1210, Ratings=AEC-Q200, Supplier Part Number 1=445-13030-1-ND, Temperature Coefficient=X7R, Tolerance=±20%, Voltage - Rated=50V, Category=Capacitors, ComponentLink1Description="Datasheet (Internal)", ComponentLink1URL=datasheets\TDK\mlcc_automotive_general_en.pdf, ComponentLink2Description="Datasheet (External)", ComponentLink2URL=https://product.tdk.com/info/en/catalog/datasheets/mlcc_automotive_general_en.pdf, Features=-, Manufacturer Part Number=CGA6P3X7R1H475M250AB, Substitution Notes="4.7µF , 50V , ±20% , X7R , -55°C ~ 125°C , AEC-Q200 , 1210", Supplier 1=Digikey, Thickness (Max)=2.80MM
C45 C46 C57: library part CGA5L1X7R1V106K160AE, "CAP CER 10UF 35V X7R 1206", Manufacturer="TDK Corporation", Operating Temperature="-55°C ~ 125°C", Package=1206, Ratings=AEC-Q200, Supplier Part Number 1=445-172483-1-ND, Temperature Coefficient=X7R, Tolerance=±10%, Voltage - Rated=35V, Category=Capacitors, ComponentLink1Description="Datasheet (Internal)", ComponentLink1URL=datasheets\TDK\mlcc_automotive_general_en.pdf, ComponentLink2Description="Datasheet (External)", ComponentLink2URL=https://product.tdk.com/info/en/catalog/datasheets/mlcc_automotive_general_en.pdf, Features="Soft Termination", Manufacturer Part Number=CGA5L1X7R1V106K160AE, Substitution Notes="10µF , 35V , ±10% , X7R , -55°C ~ 125°C , AEC-Q200 , 1206", Supplier 1=Digikey, Thickness (Max)=1.90MM
C48: library part EEE-FK1E330UR, "CAP ALUM 33UF 25V 20% SMD", ESR (Equivalent Series Resistance)=-, Lifetime @ Temp#="2000 Hrs @ 105°C", Manufacturer="Panasonic Electronic Components", Operating Temperature="-55°C ~ 105°C", Package=C, Package / Case="Radial- Can - SMD", Ripple Current=160mA, Sort Value=33000000, Sort Value Package=C_33000000, Supplier Part Number 1=PCE3802CT-ND, Temperature Coefficient="Temperature Coefficient", Tolerance=±20%, Value_Voltage="33µF  25V", Voltage Rating=25V, Capacitance=33µF, Category=Capacitors, ComponentLink1Description="Internal Datasheet", ComponentLink1URL=http://industrial.panasonic.com/www-cgi/jvcr13pz.cgi?E+PZ+3+ABA0120+EEEFK1E330UR+7+WW, ComponentLink2Description="External Datasheet", ComponentLink2URL=http://industrial.panasonic.com/www-cgi/jvcr13pz.cgi?E+PZ+3+ABA0120+EEEFK1E330UR+7+WW, Diameter=5.00, F40=UR, Features="General Purpose", Height=5.80, Height - Seated (Max)="0.228\" (5.80mm)", Impedance="700 mOhm", Lead Spacing=-, Manufacturer Part Number=EEE-FK1E330UR, Mounting Type="Surface Mount", Packaging="Cut Tape (CT)", Pricing="1 = 0.63  ;  50 = 0.3576  ;  100 = 0.298  ;  250 = 0.22348  ;  500 = 0.19072 (USD)", Sales Status=Active, Size / Dimension="0.197\" Dia (5.00mm)", Stocked=0, Supplier 1=Digi-Key, Surface Mount Land Size="0.209\" L x 0.209\" W (5.30mm x 5.30mm)"
C55 C56: library part CGA3E2X7R1H472K080AE, "CAP CER 4700PF 50V X7R 0603", Manufacturer="TDK Corporation", Operating Temperature="-55°C ~ 125°C", Package=0603, Ratings=AEC-Q200, Supplier Part Number 1=445-173691-1-ND, Temperature Coefficient=X7R, Tolerance=±10%, Voltage - Rated=50V, Category=Capacitors, ComponentLink1Description="Datasheet (Internal)", ComponentLink1URL=datasheets\TDK\mlcc_automotive_general_en.pdf, ComponentLink2Description="Datasheet (External)", ComponentLink2URL=https://product.tdk.com/info/en/catalog/datasheets/mlcc_automotive_general_en.pdf, Features="Soft Termination", Manufacturer Part Number=CGA3E2X7R1H472K080AE, Substitution Notes="4700pF , 50V , ±10% , X7R , -55°C ~ 125°C , AEC-Q200 , 0603", Supplier 1=Digikey, Thickness (Max)=0.95MM
D1: library part APT1608CGCK, Color=Green, Current - Test=20mA, Luminous Flux @ Current - Test=-, Manufacturer="Kingbright Corp", Millicandela Rating=50mcd, Package / Case="0603 (1608 Metric)", Supplier Part Number 1=754-1116-1-ND, Voltage - Forward (Vf) Typ=2.1V, Category=Optoelectronics, ComponentLink1Description=http://www.us.kingbright.com/images/catalog/SPEC/APT1608CGCK.pdf, ComponentLink1URL=http://www.us.kingbright.com/images/catalog/SPEC/APT1608CGCK.pdf, Height=0.75mm, Lens Style/Size="Rectangle with Flat Top, 1.2mm x 0.8mm", Lens Type=Clear, Manufacturer Part Number=APT1608CGCK, Mounting Type="Surface Mount", Packaging="Tape & Reel (TR)", Pricing 1="1=0.2, 10=0.153, 25=0.1224, 100=0.1105, 250=0.102, 500=0.0918 (USD)", RoHS="RoHS Compliant", Size / Dimension="1.60mm L x 0.80mm W", Stock 1=89450, Supplier 1=Digi-Key, Supplier 2=Digikey, Supplier Part Number 2=160-2162-1-ND, Viewing Angle=120°, Wavelength - Dominant=570nm, Wavelength - Peak=574nm
D2: "DIODES INC.         BAV99T-7-F            Small Signal Diode, Switching, Dual Series, 85 V, 155 mA, 1.25 V, 4 ns, 4 A", Average Rectified Current=75mA, Capacitance=1.5pF, Case/Package=SOT-523, Current Rating=50mA, Forward Current=155mA, Forward Voltage=1.25V, Manufacturer=Diodes, Max Forward Surge Current (Ifsm)=4A, Max Operating Temperature=150°C, Max Repetitive Reverse Voltage (Vrrm)=85V, Min Operating Temperature=-65°C, Package Quantity=3000, Peak Reverse Current=2uA, Power Dissipation=150mW, Supplier Part Number 1=BAV99T-FDICT-ND, ComponentLink1Description=https://datasheet.ciiva.com/8301/ds30260-8301823.pdf, ComponentLink1URL=https://datasheet.ciiva.com/8301/ds30260-8301823.pdf, ComponentLink2Description=https://datasheet.ciiva.com/25946/ds30260-25946623.pdf, ComponentLink2URL=https://datasheet.ciiva.com/25946/ds30260-25946623.pdf, Contact Plating=Tin,Matte, Height=0.75mm, Lead Free="Lead Free", Length=1.6mm, Manufacturer Part Number=BAV99T-7-F, Max Reverse Voltage (DC)=85V, Max Surge Current=4A, Mount="Surface Mount", Number of Pins=3, Packaging="Tape and Reel", Peak Non-Repetitive Surge Current=4A, Power Rating=150mW, Pricing 1="1=0.34, 10=0.28, 100=0.1485, 500=0.09772, 1000=0.06645 (USD)", Radiation Hardening=No, REACH SVHC="No SVHC", Recovery Time=4ns, Reverse Recovery Time=4ns, Stock 1=184990, Supplier 1=Digi-Key, Voltage Rating (DC)=85V, Weight=7.1E-05oz, Width=0.8mm
D3 D4 D5 D6: "DIODE SCHOTTKY 60V 1A SMA", Capacitance @ Vr- F="110pF @ 4V- 1MHz", Current - Average Rectified (Io)=1A, Current - Reverse Leakage @ Vr="500µA @ 60V", Manufacturer="Diodes Inc", Package="DO-214AC- SMA", Supplier Device Package=SMA, Supplier Part Number 1=B160-FDICT-ND, Voltage - DC Reverse (Vr) (Max)=60V, Voltage - Forward (Vf) (Max) @ If="700mV @ 1A", Category=Diodes, CategorySort=400, ComponentLink1Description="Internal Datasheet", ComponentLink1URL=http://www.diodes.com/datasheets/ds13002.pdf, ComponentLink2Description="External Datasheet", ComponentLink2URL=http://www.diodes.com/datasheets/ds13002.pdf, Diode Suffix=1A_2C, Diode Type=Schottky, Manufacturer Part Number=B160-13-F, Mounting Type="Surface Mount", Num Pins=2, Packaging="Cut Tape (CT)", Reverse Recovery Time (trr)=-, SortValue=B160-13-F, Speed="Fast Recovery =< 500ns- > 200mA (Io)", Supplier 1=Digi-Key
D7: "DIODE ARRAY GP 100V 215MA SOT23", Average Rectified Current=215mA, Breakdown Voltage=75V, Case/Package=TO-236-3, Forward Voltage=1.25V, Manufacturer="NXP Semiconductors", Max Forward Surge Current (Ifsm)=4A, Max Operating Temperature=150°C, Max Power Dissipation=250W, Max Repetitive Reverse Voltage (Vrrm)=100V, Min Operating Temperature=-65°C, Package Quantity=1, Peak Reverse Current=500nA, Power Dissipation=250mW, Supplier Part Number 1=954-BAV99215-CHP, ComponentLink1Description=https://datasheet.ciiva.com/33728/953882-33728752.pdf, ComponentLink1URL=https://datasheet.ciiva.com/33728/953882-33728752.pdf, ComponentLink2Description=https://datasheet.ciiva.com/904/bav99-ser-904513.pdf, ComponentLink2URL=https://datasheet.ciiva.com/904/bav99-ser-904513.pdf, ComponentLink3Description=https://datasheet.ciiva.com/4434/bav99-ser-4434805.pdf, ComponentLink3URL=https://datasheet.ciiva.com/4434/bav99-ser-4434805.pdf, ComponentLink4Description=https://datasheet.ciiva.com/16474/bav99-ser-16474903.pdf, ComponentLink4URL=https://datasheet.ciiva.com/16474/bav99-ser-16474903.pdf, ComponentLink5Description=https://datasheet.ciiva.com/22628/953882-22628007.pdf, ComponentLink5URL=https://datasheet.ciiva.com/22628/953882-22628007.pdf, ComponentLink6Description=https://datasheet.ciiva.com/36858/953882-36858552.pdf, ComponentLink6URL=https://datasheet.ciiva.com/36858/953882-36858552.pdf, ComponentLink7Description=https://datasheet.ciiva.com/904/bav99-ser-904509.pdf, ComponentLink7URL=https://datasheet.ciiva.com/904/bav99-ser-904509.pdf, ComponentLink8Description=https://datasheet.ciiva.com/904/bav99-ser-904511.pdf, ComponentLink8URL=https://datasheet.ciiva.com/904/bav99-ser-904511.pdf, Contact Plating=Tin,Matte, Forward Current=215mA, Height=0.25inch, Lead Free="Lead Free", Length=0.25inch, Manufacturer Part Number=BAV99,215, Max Reverse Voltage (DC)=100V, Max Surge Current=4A, Mount="Surface Mount", Number of Pins=3, Packaging="Tape and Reel", Peak Non-Repetitive Surge Current=4A, REACH SVHC="No SVHC", Recovery Time=4ns, Reverse Recovery Time=4ns, Stock 1=0, Supplier 1=Digi-Key, Termination=SMD/SMT, Voltage=100V, Weight=0.01lb, Width=0.25inch
F1 F2 F3: library part Fiducial
HW1: "CBL CLIP 1-1.5MM DIA CBL SMD", Colour=Natural,Silver, Manufacturer=Harwin, Package Quantity=1500, Supplier Part Number 1=952-1577-1-ND, Wire/Cable Colour=Grey, ComponentLink1Description=https://datasheet.ciiva.com/73/s8111r-73504.pdf, ComponentLink1URL=https://datasheet.ciiva.com/73/s8111r-73504.pdf, ComponentLink2Description=https://datasheet.ciiva.com/5230/s8111r-65574-5230384.pdf, ComponentLink2URL=https://datasheet.ciiva.com/5230/s8111r-65574-5230384.pdf, ComponentLink3Description=https://datasheet.ciiva.com/73/s8111r-73505.pdf, ComponentLink3URL=https://datasheet.ciiva.com/73/s8111r-73505.pdf, ComponentLink4Description=https://datasheet.ciiva.com/1515/1694708-1515016.pdf, ComponentLink4URL=https://datasheet.ciiva.com/1515/1694708-1515016.pdf, ComponentLink5Description=https://datasheet.ciiva.com/30474/0900766b81270b7b-30474510.pdf, ComponentLink5URL=https://datasheet.ciiva.com/30474/0900766b81270b7b-30474510.pdf, Depth=5mm, Height=0.081inch, Length=5mm, Manufacturer Part Number=S8111-46R, Material=Bronze,Copper,Tin, Material Thickness=0.008inch, Mount=Solder, Orientation=Straight, Packaging="Tape and Reel", Pricing 1="1=0.27, 10=0.254, 25=0.218, 50=0.1852, 100=0.1779, 250=0.15972, 500=0.15246 (USD)", Radiation Hardening=No, REACH SVHC="No SVHC", Stock 1=36199, Supplier 1=Digi-Key, Width=5mm
J1: library part CORTEX-DEBUG, "SAMTEC - FTSH-105-01-F-DV - .050 X .050", Manufacturer=SAMTEC, Supplier Part Number 1=01R3399, Category=Connectors, Manufacturer Part Number=FTSH-105-01-F-DV, Pricing 1="1=0.974, 25000=0.835, 50000=0.774 (USD)", Stock 1=0, Supplier 1=Newark
J2: "Tag Connect Pads - No latching Clips - ARM"
J3: library part SM06B-SRSS-TB(LF)(SN), "6 Positions Header, Shrouded Connector 0.039\" (1.00mm) Surface Mount, Right Angle Tin", Colour=Natural, Contact Resistance=40mR, Current Rating=1A, Flammability Rating="UL94 V-0", Housing Colour=Beige, Insulation Resistance=100MR, Manufacturer=JST, Max Operating Temperature=85°C, Max Voltage Rating (AC)=50V, Min Operating Temperature=-25°C, Supplier Part Number 1=455-1806-1-ND, ComponentLink1Description=https://datasheet.ciiva.com/11752/0900766b8082f544-11752176.pdf, ComponentLink1URL=https://datasheet.ciiva.com/11752/0900766b8082f544-11752176.pdf, ComponentLink2Description=https://datasheet.ciiva.com/16217/sm06b-srss-tblfsn-16217552.pdf, ComponentLink2URL=https://datasheet.ciiva.com/16217/sm06b-srss-tblfsn-16217552.pdf, ComponentLink3Description=https://datasheet.ciiva.com/26894/getdatasheetpartid-490708-26894951.pdf, ComponentLink3URL=https://datasheet.ciiva.com/26894/getdatasheetpartid-490708-26894951.pdf, ComponentLink4Description=https://datasheet.ciiva.com/26894/getdatasheetpartid-639890-26894680.pdf, ComponentLink4URL=https://datasheet.ciiva.com/26894/getdatasheetpartid-639890-26894680.pdf, ComponentLink5Description=https://datasheet.ciiva.com/8052/91630-8052281.pdf, ComponentLink5URL=https://datasheet.ciiva.com/8052/91630-8052281.pdf, ComponentLink6Description=https://datasheet.ciiva.com/712/esr-712571.pdf, ComponentLink6URL=https://datasheet.ciiva.com/712/esr-712571.pdf, ComponentLink7Description=https://datasheet.ciiva.com/712/esr-712572.pdf, ComponentLink7URL=https://datasheet.ciiva.com/712/esr-712572.pdf, ComponentLink8Description=https://datasheet.ciiva.com/730/esr-730671.pdf, ComponentLink8URL=https://datasheet.ciiva.com/730/esr-730671.pdf, Connector Type="Male Pin", Contact Material="Copper,Copper Alloy", Contact Plating=Copper,Tin,Lead, Depth=4.95mm, Gender=Male, Housing Material=Polyamide, Lead Free="Lead Free", Lead Pitch=1mm, Length=8mm, Manufacturer Part Number=SM06B-SRSS-TB(LF)(SN), Material=Polyamide, Max Current Rating=1A, Max Voltage Rating (DC)=50V, Mount="Surface Mount", Number of Contacts=6, Number of Positions=6, Number of Rows=1, Orientation="Right Angle", Packaging="Tape and Reel", Pitch=1mm, Pricing 1="1=0.83, 10=0.782, 100=0.5996, 500=0.5214, 1000=0.4301 (USD)", REACH SVHC="No SVHC", Stock 1=40560, Supplier 1=Digi-Key, Termination=Solder, Voltage Rating=50V, Voltage Rating (AC)=50V
J4: "8 Positions Header, Shrouded Connector 0.039\" (1.00mm) Surface Mount, Right Angle Tin", Colour=Natural, Contact Resistance=20mR, Current Rating=1A, Flammability Rating="UL94 V-0", Insulation Resistance=100MR, Manufacturer=JST, Max Operating Temperature=85°C, Min Operating Temperature=-25°C, Supplier Part Number 1=455-1808-1-ND, Voltage Rating=50V, ComponentLink1Description=https://datasheet.ciiva.com/712/esr-712599.pdf, ComponentLink1URL=https://datasheet.ciiva.com/712/esr-712599.pdf, ComponentLink2Description=https://datasheet.ciiva.com/712/esr-712600.pdf, ComponentLink2URL=https://datasheet.ciiva.com/712/esr-712600.pdf, ComponentLink3Description=https://datasheet.ciiva.com/8052/91630-8052285.pdf, ComponentLink3URL=https://datasheet.ciiva.com/8052/91630-8052285.pdf, ComponentLink4Description=https://datasheet.ciiva.com/729/esr-729838.pdf, ComponentLink4URL=https://datasheet.ciiva.com/729/esr-729838.pdf, ComponentLink5Description=https://datasheet.ciiva.com/11752/0900766b8082f54b-11752174.pdf, ComponentLink5URL=https://datasheet.ciiva.com/11752/0900766b8082f54b-11752174.pdf, ComponentLink6Description=https://datasheet.ciiva.com/16487/esr-16487087.pdf, ComponentLink6URL=https://datasheet.ciiva.com/16487/esr-16487087.pdf, Connector Type="Male Pin", Contact Material="Copper,Copper Alloy", Contact Plating=Tin,Lead, Gender=Male, Housing Colour=Natural, Housing Material=Nylon, Lead Free="Lead Free", Lead Pitch=1mm, Manufacturer Part Number=SM08B-SRSS-TB(LF)(SN), Material=Polyamide, Mount="Surface Mount", Number of Contacts=8, Number of Positions=8, Number of Rows=1, Orientation="Right Angle", Packaging="Tape and Reel", Pitch=0.039inch, Pricing 1="1=0.9, 10=0.793, 100=0.6838, 500=0.55948, 1000=0.49731 (USD)", REACH SVHC="No SVHC", Stock 1=51779, Supplier 1=Digi-Key, Termination=Solder, Voltage Rating (AC)=50V
J5: "CONN UMCC JACK STR 50OHM SMD", Dielectric Material="Liquid Crystal Polymer (LCP)", Housing Color=Ivory, Manufacturer="TE Connectivity AMP Connectors", Operating Temperature="-40°C ~ 90°C", Supplier Part Number 1=A118077CT-ND, Voltage Rating=60V, Body Finish=Gold, Body Material="Copper Alloy", Cable Group=-, Category="Connectors, Interconnects", Center Contact Material="Copper Alloy", Center Contact Plating=Gold, ComponentLink1Description=http://www.te.com/commerce/DocumentDelivery/DDEController?Action=srchrtrv&DocNm=1909763&DocType=Customer+Drawing&DocLang=English, ComponentLink1URL=http://www.te.com/commerce/DocumentDelivery/DDEController?Action=srchrtrv&DocNm=1909763&DocType=Customer+Drawing&DocLang=English, Connector Style="Ultra Miniature Coaxial", Connector Type="Jack, Male Pin", Contact Termination=Solder, Fastening Type=Snap-On, Features=-, Impedance="50 Ohm", Includes=-, Ingress Protection=-, Insertion Loss=0.24dB, Manufacturer Part Number=1909763-1, Mating Cycles=30, Mounting Feature=-, Mounting Type="Surface Mount", Packaging="Cut Tape (CT)", Part Status=Active, Pricing 1="1=0.49, 10=0.462, 25=0.416, 50=0.3696, 100=0.3542, 250=0.3234, 500=0.308, 1000=0.2541, 2500=0.231 (USD)", RoHS="RoHS Compliant", Shield Termination=Solder, Stock 1=75031, Supplier 1=Digi-Key
J6: "Conn Shrouded Header HDR 4 POS 1mm Solder RA SMD T/R", Colour=Natural, Contact Resistance=40mR, Housing Colour=Beige, Manufacturer=JST, Max Current Rating=1A, Max Operating Temperature=85°C, Max Voltage Rating (AC)=50V, Min Operating Temperature=-25°C, Supplier Part Number 1=455-1804-1-ND, ComponentLink1Description=https://datasheet.ciiva.com/26894/getdatasheetpartid-499363-26894945.pdf, ComponentLink1URL=https://datasheet.ciiva.com/26894/getdatasheetpartid-499363-26894945.pdf, ComponentLink2Description=https://datasheet.ciiva.com/26894/getdatasheetpartid-640736-26894676.pdf, ComponentLink2URL=https://datasheet.ciiva.com/26894/getdatasheetpartid-640736-26894676.pdf, ComponentLink3Description=https://datasheet.ciiva.com/16487/jstsm04b-srss-tb-lf-sn-16487222.pdf, ComponentLink3URL=https://datasheet.ciiva.com/16487/jstsm04b-srss-tb-lf-sn-16487222.pdf, Connector Type="Male Pin", Contact Material="Copper Alloy", Contact Plating=Copper,Tin, Depth=4.95mm, Housing Material=Polyamide, Lead Free="Lead Free", Length=6mm, Manufacturer Part Number=SM04B-SRSS-TB(LF)(SN), Max Voltage Rating (DC)=50V, Mount="Surface Mount", Number of Contacts=4, Number of Positions=4, Number of Rows=1, Orientation="Right Angle", Packaging="Tape and Reel", Pitch=0.039inch, Pricing 1="1=0.61, 10=0.569, 100=0.436, 500=0.37914, 1000=0.31279 (USD)", Stock 1=43886, Supplier 1=Digi-Key, Termination=Solder
L1 L2 L3 L4: "FERRITE BEAD 60 OHM 0805 1LN", Current Rating (Max)=3A, DC Resistance (DCR) (Max)="25 mOhm", Impedance @ Frequency="60 Ohm @ 100MHz", Manufacturer="Taiyo Yuden", Operating Temperature="-55°C ~ 85°C", Package / Case="0805 (2012 Metric)", Ratings=-, Supplier Part Number 1=587-3973-1-ND, Category=Filters, ComponentLink1Description=http://ds.yuden.co.jp/TYCOMPAS/ut/detail.do?productNo=BKP2125HS600-T&fileName=BKP2125HS600-T_SS&mode=specSheetDownload, ComponentLink1URL=http://ds.yuden.co.jp/TYCOMPAS/ut/detail.do?productNo=BKP2125HS600-T&fileName=BKP2125HS600-T_SS&mode=specSheetDownload, ComponentLink2Description=http://ds.yuden.co.jp/TYCOMPAS/ut/detail.do?productNo=BKP2125HS600-TV&fileName=BKP2125HS600-TV_SS&mode=specSheetDownload, ComponentLink2URL=http://ds.yuden.co.jp/TYCOMPAS/ut/detail.do?productNo=BKP2125HS600-TV&fileName=BKP2125HS600-TV_SS&mode=specSheetDownload, Filter Type="Power Line", Height (Max)="0.041\" (1.05mm)", Manufacturer Part Number=BKP2125HS600-T, Mounting Type="Surface Mount", Number of Lines=1, Packaging="Tape & Reel (TR)", Pricing 1="1=0.21, 10=0.17, 50=0.1094, 100=0.0943, 250=0.07548, 500=0.06792, 1000=0.0566 (USD)", RoHS="RoHS Compliant", Size / Dimension="0.079\" L x 0.049\" W (2.00mm x 1.25mm)", Stock 1=7069, Supplier 1=Digi-Key
L5 L6: library part NRS5020T220MMGJ, "Inductor 22µH 0.9A", Inductance (uH)=22, Manufacturer="Taiyo Yuden", Package=NRS5020, Rating=-, Sort Value=22_0.9, Sort Value Package=22_0.9_NRS5020, Supplier Part Number 1=587-2411-1-ND, Tolerance=±20%, Category=Inductors, CategorySort=300, ComponentLink1Description="External Datasheet", ComponentLink1URL=http://ds.yuden.co.jp/TYCOMPAS/ut/detail.do?productNo=NRS5020T220MMGJV&fileName=NRS5020T220MMGJV_SS&mode=specSheetDownload, DCR Max (Ohms)="312 mOhm Max", Height (mm)=2mm, IRMS=1, Isat (A)=0.9, Manufacturer Part Number=NRS5020T220MMGJ, Part Number=NRS5020T220MMGJ, Shielding=Sheilded, SRF typ (MHz)=17MHz, Supplier 1=Digikey, Supplier Unit Price 1=0.34